# Altium PCB Round_2.PcbDoc
Units mil, origin at the board's own origin, x right, y up, seen from the top; angles counter-clockwise.
Board outline 6000 x 4000 mil, 2 copper layers (Top Layer, Bottom Layer); 14 components, 10 nets, 28 pads, 0 vias.
Unrouted connection lines stored in the file: 18.
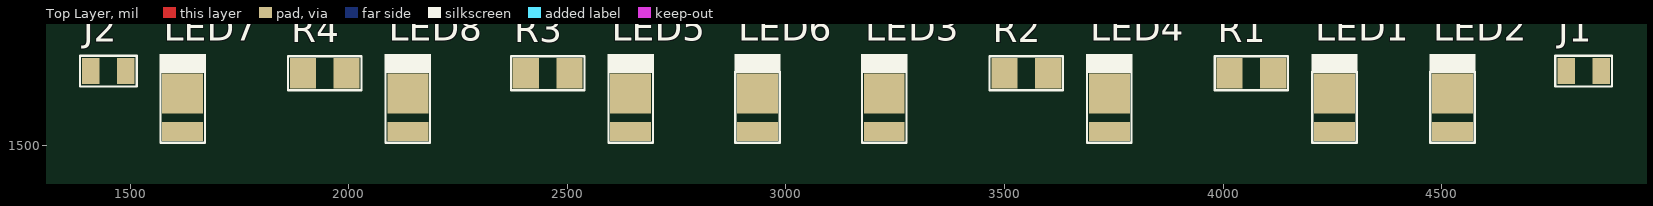
[diagram p0: Top Layer view]
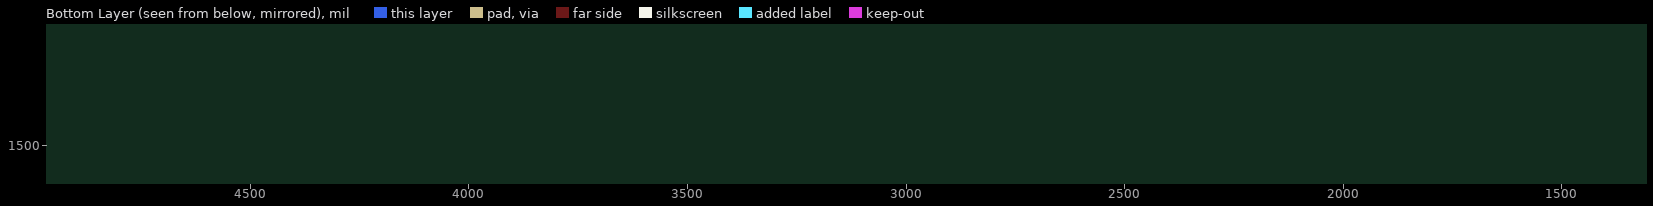
[diagram p1: Bottom Layer view, seen from below]

## Layer stack, top to bottom
Top Solder: solder mask 0.4, Solder Resist, Dk 3.5
Top Layer: signal copper 1.4
Dielectric 1: dielectric 12.6, FR-4, Dk 4.8
Bottom Layer: signal copper 1.4
Bottom Solder: solder mask 0.4, Solder Resist, Dk 3.5

## Board outline
0,0 6000,0 6000,4000 0,4000

## Design rules (kind name [scope] priority, off if disabled: settings)
Clearance [All] p1: gap=10 ignorepadtopadclearanceinfootprint=FALSE except(0: Arc-Hole Track-Hole SMDPad-Hole THPad-Hole Via-Hole Fill-Hole Poly-Hole Region-Hole Text-Hole)
ComponentClearance [All] p1: gap=0 collisioncheckmode=3 verticalgap=0 showdistances=FALSE
HoleSize [All] p1: absolutevalues=TRUE maxlimit=1000 minlimit=1 maxpercent=80.000 minpercent=20.000
HoleToHoleClearance [All] p1: gap=0 allowstackedmicrovias=TRUE
MinimumSolderMaskSliver [All] p1: minsoldermaskwidth=0
PolygonConnect [All] p1: connectstyle=Relief reliefconductorwidth=10 reliefentries=4 polygonreliefangle="90 Angle" airgapwidth=10
RoutingVias [All] p1: holewidth=11.81 width=31.5 viastyle="Through Hole" minholewidth=7.87 minwidth=17.72 maxholewidth=11.81 maxwidth=31.5
SilkToSilkClearance [All] p1: silktosilkclearance=0
SolderMaskExpansion [All] p1: expansion=4
Width [All] p1: maxlimit=100 minlimit=10 preferedwidth=10 minimp=50.000000 maximp=50.000000 favimp=50.000000
25 further rules are at their usual default settings.

## Components (designator, comment, footprint, x,y, rotation, side; value= is the part's Value field where it differs from the comment)
J1 "SMD PADS" "SMD PAD" 4825,1670 r0 top
J2 "SMD PADS" "SMD PAD" 1450,1670 r0 top
LED1 "White LED" "White LED" 4255,1575 r90 top value=Custom
LED2 "White LED" "White LED" 4525,1575 r90 top value=Custom
LED3 "White LED" "White LED" 3225,1575 r90 top value=Custom
LED4 "White LED" "White LED" 3740,1575 r90 top value=Custom
LED5 "White LED" "White LED" 2645,1575 r90 top value=Custom
LED6 "White LED" "White LED" 2935,1575 r90 top value=Custom
LED7 "White LED" "White LED" 1620,1575 r90 top value=Custom
LED8 "White LED" "White LED" 2135,1575 r90 top value=Custom
R1 "5R1" Res1206 4065,1665 r0 top
R2 "5R1" Res1206 3550,1665 r0 top
R3 "5R1" Res1206 2455,1665 r0 top
R4 "5R1" Res1206 1945,1665 r0 top

## Footprints (in the part's own frame and the unit in brackets; to place one, negate y for a bottom-side part, rotate by r counter-clockwise, add the part's x,y. Pads: shape width x height; smd on the part's side, far side on the other; paste and mask are expansions set on the pad)
Res1206 [mil]
  rect 60x70 smd: 1(-50,0) 2(50,0)
  silkscreen extent -84,-39 84,39, body extent -63,-31 63,32, height 39
"SMD PAD" [mil] "SMD 0805"
  rect 40x60 smd: 1(-40,0) 2(40,0)
  silkscreen extent -65,-35 65,35
"White LED" [mm]
  rect 2.33x2.38 smd: 1(1.108,0)
  rect 1.1x2.38 smd: 2(-1.107,0)
  silkscreen extent -1.75,-1.35 3.4,1.35

## Part data
J1 J2: library part "SMD PAD"
LED1 LED2 LED3 LED4 LED5 LED6 LED7 LED8: library part HL-AM-2835H421W-S1-08-HR6(SDCM<6)(2800K-3100K)60mA, "White 2800K~3100K 2.8V~3.4V SMD,3.5x2.8x0.7mm Light Emitting Diodes (LED) RoHS", Manufacturer="HONGLITRONIC(Hongli Zhihui (HONGLITRONIC))", Package=Custom, ComponentLink1Description="Supplier Link", ComponentLink1URL=https://lcsc.com/product-detail/Light-Emitting-Diodes-LED_HONGLITRONIC-Hongli-Zhihui-HONGLITRONIC-HL-AM-2835H421W-S1-08-HR6-SDCM-6-2800K-3100K-60mA_C516131.html, Manufacturer Part No=HL-AM-2835H421W-S1-08-HR6(SDCM<6)(2800K-3100K)60mA
R1 R2 R3 R4: library part 1206W4J051JT5E, "RES SMD 5.1O ±5% 0.25W 1206", Manufacturer="UNI-ROYAL(Uniroyal Elec)", Package=1206, Power(Watts)=0.25W, Resistance=5.1O, Temperature Coefficient=±400ppm/?, Tolerance=±5%

## Nets (pads, with @x,y where several pads share a name; then routed paths per layer and width w, separated by ;. In a path a pad name is that pad's centre, name@x,y a point inside that pad or via, vN(x,y) a via of type N, cw(c..) or ccw(c..) an arc to the next point about the centre after c; other vN are vias at no path point)
GND: J1.2 J2.2 LED2.1 LED4.1 LED6.1 LED8.1
LED_IN: J1.1 J2.1 LED3.2 LED7.2 R1.2 R3.2
NetLED1_1: LED1.1 LED2.2
NetLED1_2: LED1.2 R1.1
NetLED3_1: LED3.1 R2.2
NetLED4_2: LED4.2 R2.1
NetLED5_1: LED5.1 LED6.2
NetLED5_2: LED5.2 R3.1
NetLED7_1: LED7.1 R4.2
NetLED8_2: LED8.2 R4.1